# Altium PCB BOARD_4LAYER.PcbDoc (part 21 of 21)
Units mil, origin at the board's own origin, x right, y up, seen from the top; angles counter-clockwise.
Board outline 6692.91 x 10039.37 mil, 4 copper layers (Top Layer, Mid Layer 1, Mid Layer 2, Bottom Layer), stack 66.299 mil thick; 1532 components, 908 nets, 4105 pads, 1286 vias.
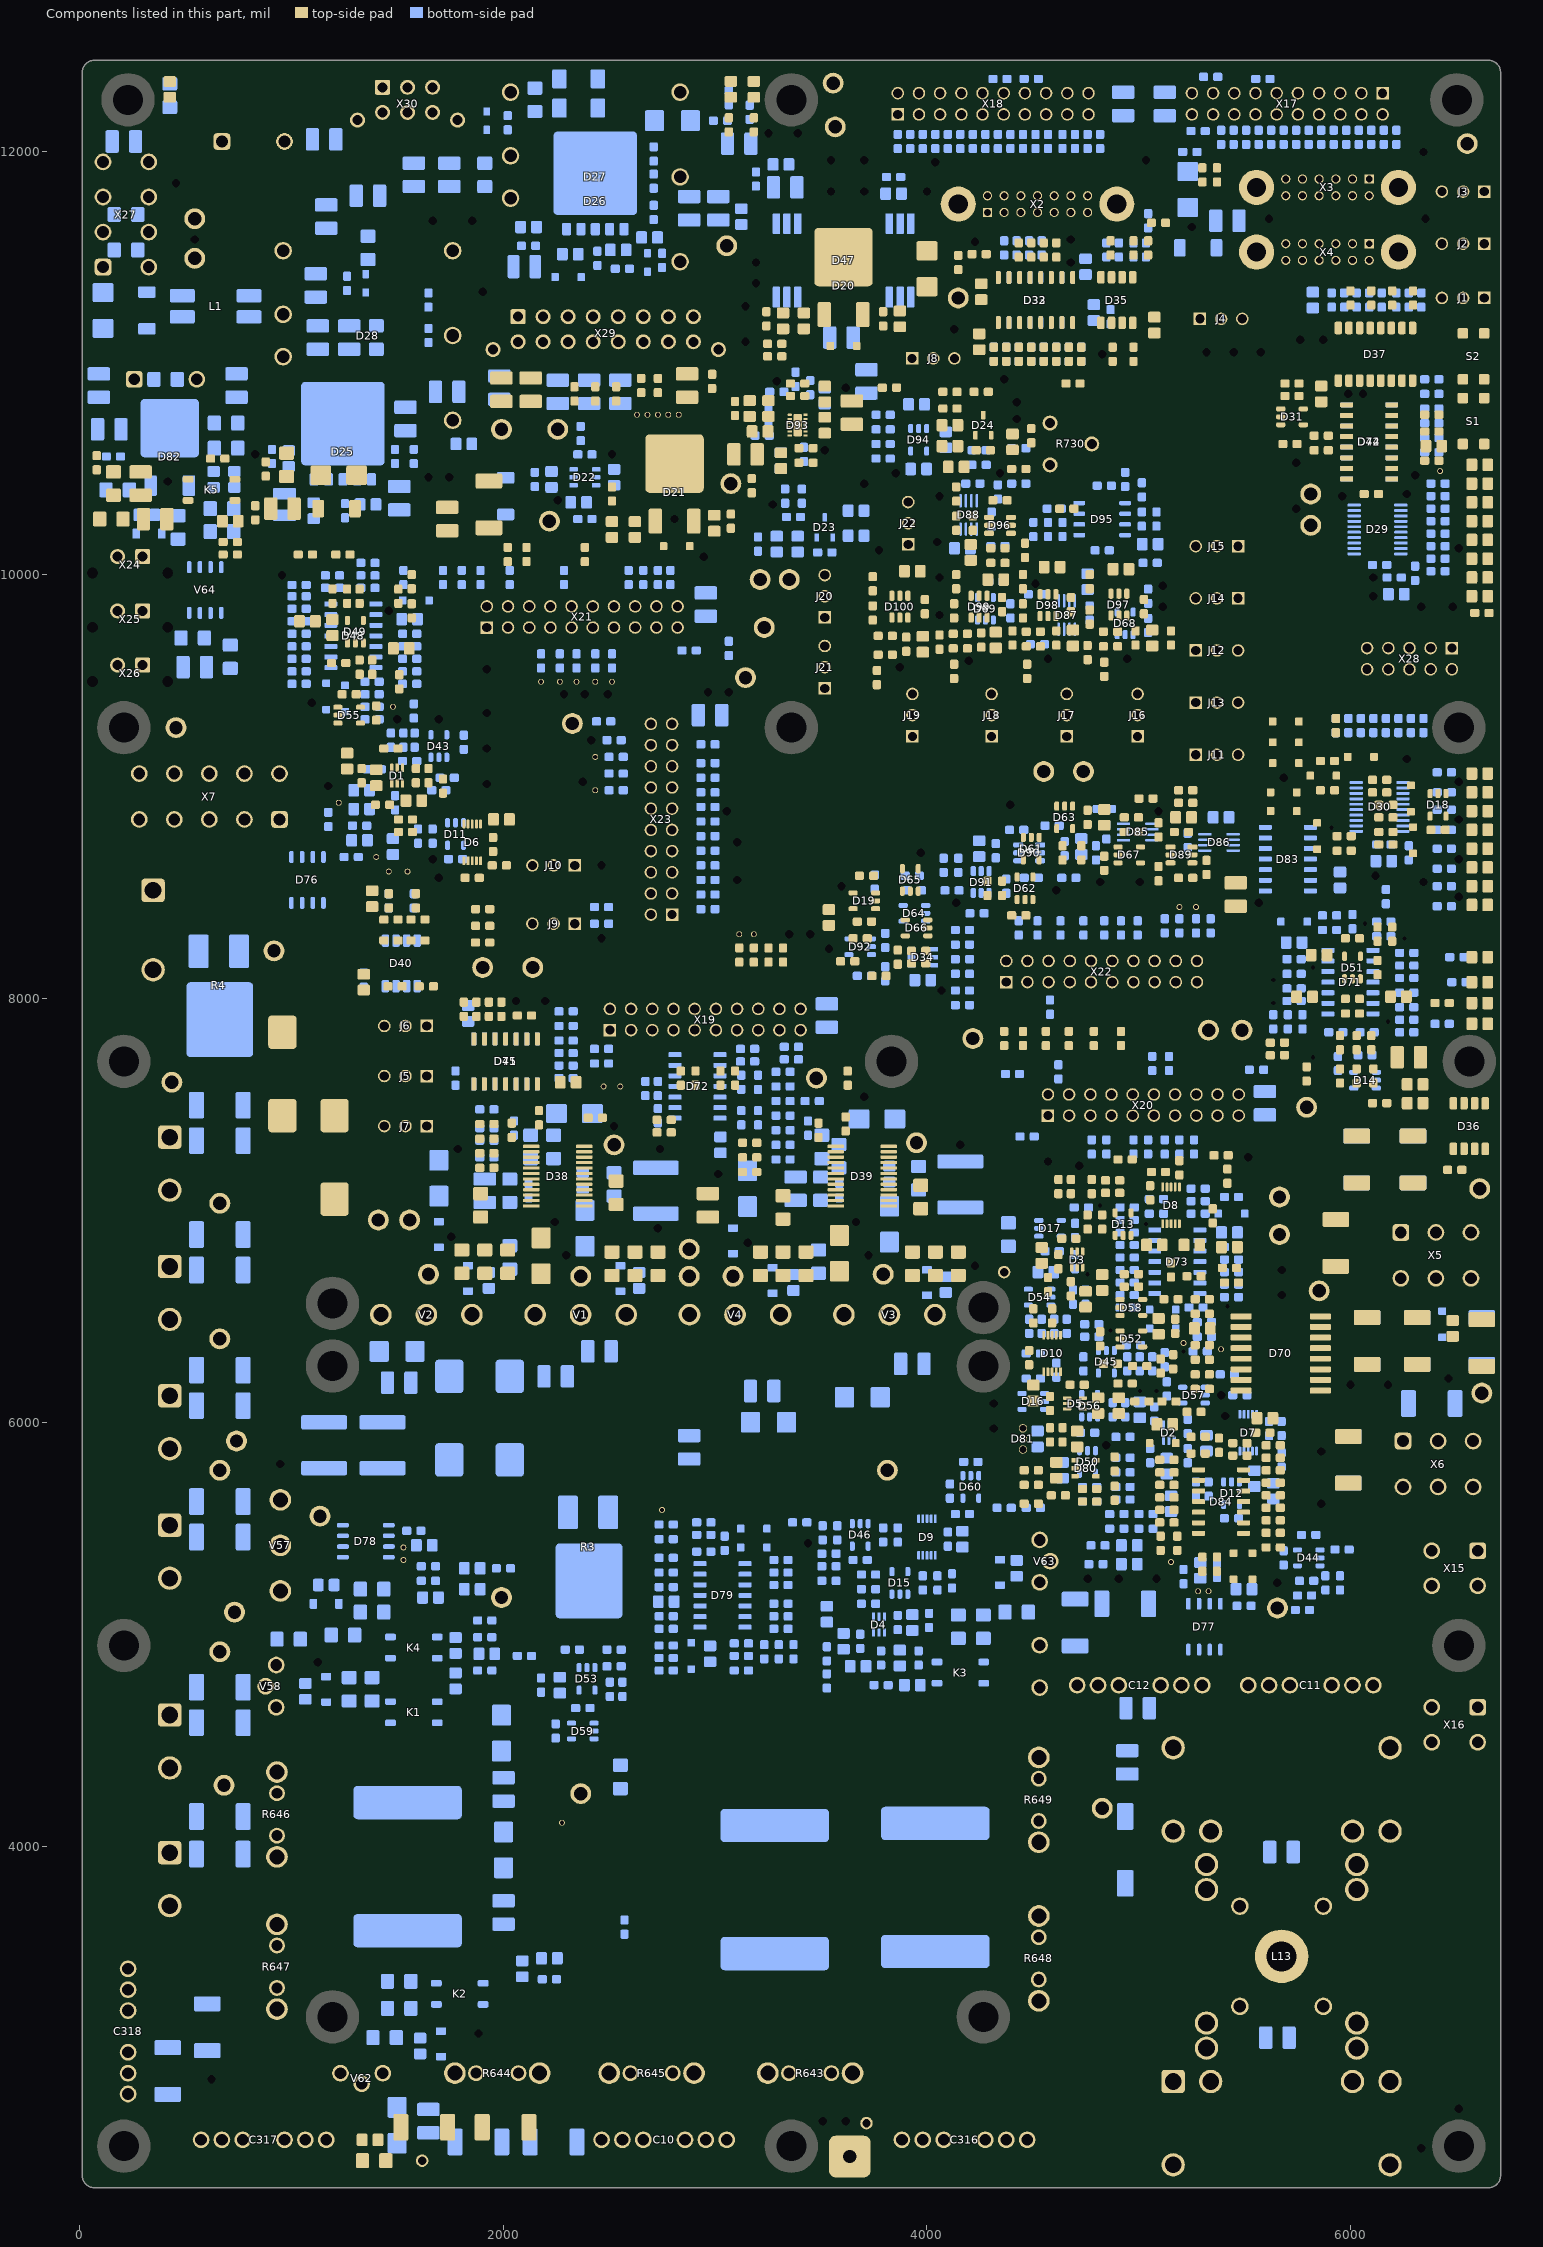
[diagram p23: the components of this part, seen from the top]

## Silkscreen, mask and mechanical layers (free items; w line width, h text height) (continued)
Drill Drawing: (continued)
  text "A" at 3057.09,7362.2 h78.74
  text "E" at 1439.37,7360.24 h78.74
  text "E" at 1539.37,7360.24 h78.74
  text "E" at 1639.37,7360.24 h78.74
  text "T" at 2523.62,7360.24 h78.74
  text "A" at 4230.31,7342.52 h78.74
  text "A" at 5167.32,7338.58 h78.74
  text "A" at 1848.43,7322.83 h78.74
  text "A" at 4316.93,7318.9 h78.74
  text "M" at 427.17,7308.07 h78.74
  text "A" at 2387.8,7295.28 h78.74
  text "A" at 3834.65,7295.28 h78.74
  text "A" at 4576.77,7291.34 h78.74
  text "A" at 3242.13,7283.46 h78.74
  text "A" at 4927.17,7283.46 h78.74
  text "K" at 3950.79,7281.5 h78.74
  text "A" at 2962.6,7279.53 h78.74
  text "A" at 1694.88,7271.65 h78.74
  text "K" at 2523.62,7271.65 h78.74
  text "T" at 4157.48,7271.65 h78.74
  text "A" at 3442.91,7255.91 h78.74
  text "T" at 1785.43,7251.97 h78.74
  text "A" at 2003.94,7251.97 h78.74
  text "T" at 2740.16,7251.97 h78.74
  text "A" at 3084.65,7244.09 h78.74
  text "A" at 3446.85,7216.54 h78.74
  text "A" at 3242.13,7212.6 h78.74
  text "T" at 5515.75,7212.6 h78.74
  text "A" at 2003.94,7208.66 h78.74
  text "T" at 4570.87,7192.91 h78.74
  text "A" at 5084.65,7192.91 h78.74
  text "A" at 4777.56,7181.1 h78.74
  text "A" at 4844.49,7181.1 h78.74
  text "A" at 5230.31,7181.1 h78.74
  text "A" at 3446.85,7177.17 h78.74
  text "T" at 4718.5,7173.23 h78.74
  text "A" at 2003.94,7165.35 h78.74
  text "A" at 5013.78,7145.67 h78.74
  text "T" at 3015.75,7133.86 h78.74
  text "A" at 1120.08,7129.92 h78.74
  text "A" at 1183.07,7129.92 h78.74
  text "A" at 2206.69,7129.92 h78.74
  text "A" at 3643.7,7125.98 h78.74
  text "A" at 4950.79,7110.24 h78.74
  text "A" at 3679.13,7102.36 h78.74
  text "A" at 2230.32,7098.43 h78.74
  text "D" at 690.94,7094.49 h78.74
  text "A" at 1482.28,7094.49 h78.74
  text "A" at 1525.59,7094.49 h78.74
  text "A" at 2966.54,7094.49 h78.74
  text "A" at 5009.84,7090.55 h78.74
  text "A" at 6198.82,7090.55 h78.74
  text "K" at 6608.27,7064.96 h78.74
  text "A" at 5356.3,7062.99 h78.74
  text "M" at 427.17,7058.07 h78.74
  text "A" at 2210.63,7047.24 h78.74
  text "A" at 3643.7,7047.24 h78.74
  text "A" at 4950.79,7043.31 h78.74
  text "A" at 5159.45,7031.5 h78.74
  text "A" at 5001.97,7027.56 h78.74
  text "A" at 6029.53,7027.56 h78.74
  text "K" at 5663.39,7025.59 h78.74
  text "A" at 2210.63,7007.87 h78.74
  text "A" at 3643.7,7007.87 h78.74
  text "K" at 663.39,6996.06 h78.74
  text "R" at 4816.93,6986.22 h78.74
  text "A" at 4383.86,6956.69 h78.74
  text "A" at 4525.59,6948.82 h78.74
  text "A" at 2533.46,6929.13 h78.74
  text "K" at 1411.42,6917.32 h78.74
  text "K" at 1559.06,6917.32 h78.74
  text "T" at 2244.09,6907.48 h78.74
  text "T" at 3665.35,6907.48 h78.74
  text "A" at 3946.85,6905.51 h78.74
  text "A" at 3990.16,6905.51 h78.74
  text "A" at 5277.56,6905.51 h78.74
  text "A" at 5513.78,6901.57 h78.74
  text "A" at 1120.08,6897.64 h78.74
  text "A" at 1183.07,6897.64 h78.74
  text "R" at 5033.46,6897.64 h78.74
  text "A" at 2533.46,6889.76 h78.74
  text "T" at 2730.32,6877.95 h78.74
  text "A" at 1875.98,6862.2 h78.74
  text "A" at 1915.35,6862.2 h78.74
  text "A" at 3297.24,6858.27 h78.74
  text "A" at 3340.55,6858.27 h78.74
  text "A" at 5155.51,6858.27 h78.74
  text "H" at 6236.22,6858.27 h78.74
  text "H" at 6401.57,6858.27 h78.74
  text "H" at 6566.93,6858.27 h78.74
  text "A" at 5336.61,6850.39 h78.74
  text "K" at 5663.39,6848.43 h78.74
  text "T" at 1755.91,6838.58 h78.74
  text "A" at 4584.65,6830.71 h78.74
  text "A" at 4746.06,6814.96 h78.74
  text "T" at 3153.54,6809.06 h78.74
  text "A" at 5159.45,6799.21 h78.74
  text "K" at 2877.95,6779.53 h78.74
  text "A" at 4872.05,6771.65 h78.74
  text "A" at 5588.58,6771.65 h78.74
  text "A" at 5513.78,6759.84 h78.74
  text "T" at 2297.24,6750 h78.74
  text "T" at 3724.41,6750 h78.74
  text "A" at 4777.56,6736.22 h78.74
  text "A" at 4844.49,6736.22 h78.74
  text "A" at 5025.59,6736.22 h78.74
  text "A" at 5360.24,6736.22 h78.74
  text "A" at 1966.54,6720.47 h78.74
  text "A" at 2675.2,6712.6 h78.74
  text "A" at 3375.98,6712.6 h78.74
  text "A" at 4092.52,6712.6 h78.74
  text "A" at 4872.05,6708.66 h78.74
  text "T" at 4226.38,6700.79 h78.74
  text "M" at 427.17,6697.83 h78.74
  text "A" at 5332.68,6696.85 h78.74
  text "T" at 5673.23,6681.1 h78.74
  text "D" at 4364.17,6671.26 h78.74
  text "A" at 5828.74,6669.29 h78.74
  text "K" at 1647.64,6661.42 h78.74
  text "K" at 3793.31,6661.42 h78.74
  text "R" at 4757.87,6661.42 h78.74
  text "A" at 5513.78,6661.42 h78.74
  text "K" at 2366.14,6651.57 h78.74
  text "K" at 2877.95,6651.57 h78.74
  text "K" at 3084.65,6651.57 h78.74
  text "A" at 4722.44,6641.73 h78.74
  text "H" at 6236.22,6641.73 h78.74
  text "H" at 6401.57,6641.73 h78.74
  text "H" at 6566.93,6641.73 h78.74
  text "A" at 5340.55,6625.98 h78.74
  text "A" at 4635.83,6622.05 h78.74
  text "A" at 4521.65,6610.24 h78.74
  text "A" at 5340.55,6586.61 h78.74
  text "A" at 5139.76,6582.68 h78.74
  text "K" at 5850.39,6582.68 h78.74
  text "A" at 5517.72,6578.74 h78.74
  text "T" at 5673.23,6562.99 h78.74
  text "A" at 4627.95,6559.06 h78.74
  text "A" at 1356.3,6555.12 h78.74
  text "A" at 1399.61,6555.12 h78.74
  text "A" at 1454.72,6555.12 h78.74
  text "A" at 1604.33,6555.12 h78.74
  text "A" at 1643.7,6555.12 h78.74
  text "A" at 1683.07,6555.12 h78.74
  text "A" at 2312.99,6555.12 h78.74
  text "A" at 2368.11,6555.12 h78.74
  text "A" at 2419.29,6555.12 h78.74
  text "A" at 2824.8,6555.12 h78.74
  text "A" at 2875.98,6555.12 h78.74
  text "A" at 2923.23,6555.12 h78.74
  text "A" at 3781.5,6555.12 h78.74
  text "A" at 3828.74,6555.12 h78.74
  text "A" at 3049.21,6551.18 h78.74
  text "A" at 3096.46,6551.18 h78.74
  text "A" at 3135.83,6551.18 h78.74
  text "A" at 3549.21,6551.18 h78.74
  text "A" at 3588.58,6551.18 h78.74
  text "A" at 3627.95,6551.18 h78.74
  text "A" at 4828.74,6539.37 h78.74
  text "P" at 1194.88,6523.62 h78.74
  text "A" at 5368.11,6511.81 h78.74
  text "R" at 5417.32,6509.84 h78.74
  text "A" at 4868.11,6507.87 h78.74
  text "A" at 5781.5,6507.87 h78.74
  text "A" at 5820.87,6507.87 h78.74
  text "A" at 5860.24,6507.87 h78.74
  text "A" at 5899.61,6507.87 h78.74
  text "P" at 4265.75,6503.94 h78.74
  text "A" at 4635.83,6492.13 h78.74
  text "A" at 4809.06,6488.19 h78.74
  text "L" at 1422.83,6470.47 h78.74
  text "L" at 1637.8,6470.47 h78.74
  text "L" at 1852.76,6470.47 h78.74
  text "L" at 2151.18,6470.47 h78.74
  text "L" at 2366.14,6470.47 h78.74
  text "L" at 2581.1,6470.47 h78.74
  text "L" at 2879.53,6470.47 h78.74
  text "L" at 3094.49,6470.47 h78.74
  text "L" at 3309.45,6470.47 h78.74
  text "L" at 3607.87,6470.47 h78.74
  text "L" at 3822.83,6470.47 h78.74
  text "L" at 4037.8,6470.47 h78.74
  text "A" at 4840.55,6464.57 h78.74
  text "D" at 683.07,6448.82 h78.74
  text "A" at 5218.5,6448.82 h78.74
  text "M" at 427.17,6447.83 h78.74
  text "A" at 5009.84,6433.07 h78.74
  text "A" at 5214.57,6411.42 h78.74
  text "R" at 4866.14,6395.67 h78.74
  text "A" at 4958.66,6374.02 h78.74
  text "A" at 6391.73,6366.14 h78.74
  text "A" at 4864.17,6358.27 h78.74
  text "K" at 663.39,6356.3 h78.74
  text "A" at 4513.78,6338.58 h78.74
  text "B" at 5210.63,6336.61 h78.74
  text "A" at 4580.71,6334.65 h78.74
  text "A" at 5127.95,6334.65 h78.74
  text "A" at 5064.96,6322.83 h78.74
  text "A" at 4738.19,6314.96 h78.74
  text "B" at 5387.8,6307.09 h78.74
  text "A" at 4057.09,6303.15 h78.74
  text "A" at 4655.51,6299.21 h78.74
  text "R" at 5210.63,6297.24 h78.74
  text "A" at 4608.27,6291.34 h78.74
  text "A" at 4057.09,6255.91 h78.74
  text "A" at 5222.44,6255.91 h78.74
  text "A" at 4777.56,6240.16 h78.74
  text "A" at 6403.54,6240.16 h78.74
  text "P" at 1194.88,6228.35 h78.74
  text "P" at 4265.75,6228.35 h78.74
  text "A" at 4057.09,6200.79 h78.74
  text "T" at 6460.63,6169.29 h78.74
  text "A" at 6076.77,6165.35 h78.74
  text "A" at 5049.21,6161.42 h78.74
  text "A" at 5175.2,6161.42 h78.74
  text "T" at 5998.03,6139.76 h78.74
  text "T" at 6175.2,6139.76 h78.74
  text "A" at 4564.96,6133.86 h78.74
  text "A" at 4612.2,6129.92 h78.74
  text "R" at 5005.91,6110.24 h78.74
  text "R" at 5082.68,6110.24 h78.74
  text "A" at 5171.26,6106.3 h78.74
  text "A" at 5045.28,6102.36 h78.74
  text "K" at 6618.11,6100.39 h78.74
  text "T" at 5387.8,6090.55 h78.74
  text "M" at 427.17,6087.6 h78.74
  text "A" at 5777.56,6059.06 h78.74
  text "A" at 5816.93,6059.06 h78.74
  text "A" at 5856.3,6059.06 h78.74
  text "A" at 5895.67,6059.06 h78.74
  text "A" at 3458.66,6055.12 h78.74
  text "A" at 3509.84,6055.12 h78.74
  text "A" at 4616.14,6055.12 h78.74
  text "A" at 4222.44,6051.18 h78.74
  text "T" at 4314.96,6051.18 h78.74
  text "A" at 5446.85,6047.24 h78.74
  text "A" at 5521.65,6043.31 h78.74
  text "A" at 5352.36,6031.5 h78.74
  text "A" at 2604.33,6027.56 h78.74
  text "A" at 2647.64,6027.56 h78.74
  text "A" at 2690.94,6027.56 h78.74
  text "A" at 2045.28,6019.69 h78.74
  text "A" at 2088.58,6019.69 h78.74
  text "A" at 2131.89,6019.69 h78.74
  text "A" at 3458.66,6015.75 h78.74
  text "A" at 3509.84,6015.75 h78.74
  text "D" at 2183.07,6007.87 h78.74
  text "D" at 2553.15,6007.87 h78.74
  text "A" at 5116.14,6007.87 h78.74
  text "A" at 5171.26,6007.87 h78.74
  text "A" at 3049.21,6003.94 h78.74
  text "A" at 3100.39,6003.94 h78.74
  text "T" at 5407.48,5992.13 h78.74
  text "A" at 2604.33,5988.19 h78.74
  text "A" at 2647.64,5988.19 h78.74
  text "A" at 2690.94,5988.19 h78.74
  text "A" at 4663.39,5984.25 h78.74
  text "A" at 2045.28,5980.31 h78.74
  text "A" at 2088.58,5980.31 h78.74
  text "A" at 2131.89,5980.31 h78.74
  text "A" at 4698.82,5968.5 h78.74
  text "A" at 3049.21,5960.63 h78.74
  text "A" at 3100.39,5960.63 h78.74
  text "A" at 5293.31,5960.63 h78.74
  text "A" at 2604.33,5948.82 h78.74
  text "A" at 2647.64,5948.82 h78.74
  text "A" at 2690.94,5948.82 h78.74
  text "A" at 4860.24,5944.88 h78.74
  text "A" at 5722.44,5944.88 h78.74
  text "A" at 2045.28,5940.94 h78.74
  text "A" at 2088.58,5940.94 h78.74
  text "A" at 2131.89,5940.94 h78.74
  text "A" at 4958.66,5935.04 h78.74
  text "C" at 4452.76,5933.86 h78.74
  text "T" at 4314.96,5933.07 h78.74
  text "A" at 5372.05,5929.13 h78.74
  text "A" at 5490.16,5917.32 h78.74
  text "A" at 5037.4,5913.39 h78.74
  text "D" at 2183.07,5909.45 h78.74
  text "D" at 2553.15,5909.45 h78.74
  text "A" at 2604.33,5909.45 h78.74
  text "A" at 2647.64,5909.45 h78.74
  text "A" at 2690.94,5909.45 h78.74
  text "C" at 4452.76,5883.86 h78.74
  text "A" at 4757.87,5875.98 h78.74
  text "K" at 742.13,5874.02 h78.74
  text "H" at 6246.06,5874.02 h78.74
  text "H" at 6411.42,5874.02 h78.74
  text "H" at 6576.77,5874.02 h78.74
  text "A" at 4994.09,5858.27 h78.74
  text "T" at 4846.46,5854.33 h78.74
  text "M" at 427.17,5837.6 h78.74
  text "C" at 4452.76,5833.86 h78.74
  text "A" at 4222.44,5830.71 h78.74
  text "T" at 5860.24,5824.8 h78.74
  text "A" at 4635.83,5822.83 h78.74
  text "A" at 4844.49,5805.12 h78.74
  text "A" at 5801.18,5803.15 h78.74
  text "A" at 4557.09,5795.28 h78.74
  text "A" at 1576.77,5787.4 h78.74
  text "A" at 1627.95,5787.4 h78.74
  text "A" at 5013.78,5787.4 h78.74
  text "A" at 5553.15,5783.46 h78.74
  text "A" at 3718.5,5779.53 h78.74
  text "A" at 5403.54,5779.53 h78.74
  text "A" at 3029.53,5775.59 h78.74
  text "A" at 4521.65,5775.59 h78.74
  text "A" at 5316.93,5775.59 h78.74
  text "T" at 948.82,5765.75 h78.74
  text "A" at 1576.77,5748.03 h78.74
  text "A" at 1627.95,5748.03 h78.74
  text "A" at 4309.06,5748.03 h78.74
  text "A" at 3718.5,5740.16 h78.74
  text "A" at 4005.91,5740.16 h78.74
  text "A" at 4348.43,5740.16 h78.74
  text "A" at 5442.91,5740.16 h78.74
  text "K" at 663.39,5736.22 h78.74
  text "K" at 3812.99,5736.22 h78.74
  text "A" at 3029.53,5732.28 h78.74
  text "D" at 3080.71,5732.28 h78.74
  text "D" at 3667.32,5732.28 h78.74
  text "A" at 5222.44,5728.35 h78.74
  text "A" at 4108.27,5716.54 h78.74
  text "A" at 5801.18,5716.54 h78.74
  text "A" at 5013.78,5712.6 h78.74
  text "A" at 4320.87,5708.66 h78.74
  text "A" at 1576.77,5704.72 h78.74
  text "A" at 1627.95,5704.72 h78.74
  text "A" at 5057.09,5700.79 h78.74
  text "A" at 3718.5,5692.91 h78.74
  text "A" at 3029.53,5688.98 h78.74
  text "A" at 4848.43,5687.01 h78.74
  text "A" at 5368.11,5681.1 h78.74
  text "A" at 4005.91,5661.42 h78.74
  text "H" at 6246.06,5657.48 h78.74
  text "H" at 6411.42,5657.48 h78.74
  text "H" at 6576.77,5657.48 h78.74
  text "A" at 4269.69,5653.54 h78.74
  text "A" at 5706.69,5649.61 h78.74
  text "A" at 5801.18,5633.86 h78.74
  text "A" at 5005.91,5625.98 h78.74
  text "A" at 5049.21,5625.98 h78.74
  text "A" at 4694.88,5622.05 h78.74
  text "A" at 2214.57,5618.11 h78.74
  text "A" at 5222.44,5618.11 h78.74
  text "A" at 5442.91,5614.17 h78.74
  text "A" at 5994.09,5614.17 h78.74
  text "A" at 5553.15,5606.3 h78.74
  text "L" at 948.82,5596.85 h78.74
  text "A" at 5706.69,5590.55 h78.74
  text "A" at 5053.15,5578.74 h78.74
  text "T" at 5860.24,5578.74 h78.74
  text "A" at 5360.24,5574.8 h78.74
  text "A" at 2214.57,5570.87 h78.74
  text "A" at 4194.88,5570.87 h78.74
  text "A" at 1222.44,5566.93 h78.74
  text "A" at 1261.81,5566.93 h78.74
  text "A" at 2706.69,5562.99 h78.74
  text "A" at 2809.06,5562.99 h78.74
  text "A" at 2923.23,5562.99 h78.74
  text "A" at 3155.51,5562.99 h78.74
  text "A" at 3277.56,5562.99 h78.74
  text "A" at 3379.92,5562.99 h78.74
  text "A" at 3470.47,5562.99 h78.74
  text "A" at 3561.02,5562.99 h78.74
  text "A" at 3679.13,5562.99 h78.74
  text "A" at 3777.56,5562.99 h78.74
  text "A" at 3895.67,5562.99 h78.74
  text "A" at 4580.71,5559.06 h78.74
  text "B" at 2750,5549.21 h78.74
  text "A" at 2214.57,5527.56 h78.74
  text "A" at 1222.44,5523.62 h78.74
  text "A" at 1261.81,5523.62 h78.74
  text "K" at 1135.83,5519.69 h78.74
  text "A" at 3903.54,5507.87 h78.74
  text "A" at 4820.87,5507.87 h78.74
  text "A" at 5710.63,5500 h78.74
  text "A" at 4116.14,5488.19 h78.74
  text "A" at 2214.57,5480.31 h78.74
  text "M" at 427.17,5477.36 h78.74
  text "A" at 5801.18,5472.44 h78.74
  text "A" at 5954.72,5472.44 h78.74
  text "A" at 6053.15,5472.44 h78.74
  text "A" at 4009.84,5468.5 h78.74
  text "A" at 3068.9,5464.57 h78.74
  text "A" at 5442.91,5464.57 h78.74
  text "A" at 4702.76,5460.63 h78.74
  text "A" at 4765.75,5460.63 h78.74
  text "A" at 4816.93,5460.63 h78.74
  text "A" at 3427.17,5448.82 h78.74
  text "A" at 5710.63,5444.88 h78.74
  text "A" at 1663.39,5433.07 h78.74
  text "A" at 4462.6,5433.07 h78.74
  text "A" at 2870.08,5425.2 h78.74
  text "A" at 4872.05,5421.26 h78.74
  text "A" at 1021.65,5413.39 h78.74
  text "H" at 4531.5,5407.48 h78.74
  text "A" at 5883.86,5405.51 h78.74
  text "A" at 5281.5,5401.57 h78.74
  text "T" at 3438.98,5391.73 h78.74
  text "A" at 4462.6,5389.76 h78.74
  text "A" at 1143.7,5385.83 h78.74
  text "A" at 1183.07,5385.83 h78.74
  text "L" at 948.82,5381.89 h78.74
  text "A" at 1718.5,5381.89 h78.74
  text "A" at 6053.15,5381.89 h78.74
  text "B" at 1529.53,5372.05 h78.74
  text "A" at 2269.68,5370.08 h78.74
  text "A" at 2328.74,5370.08 h78.74
  text "A" at 2387.8,5370.08 h78.74
  text "A" at 2450.79,5370.08 h78.74
  text "A" at 2521.65,5370.08 h78.74
  text "A" at 3320.87,5368.11 h78.74
  text "A" at 2828.74,5366.14 h78.74
  text "A" at 2706.69,5362.2 h78.74
  text "A" at 2659.45,5358.27 h78.74
  text "H" at 6381.89,5356.3 h78.74
  text "H" at 6598.43,5356.3 h78.74
  text "A" at 3828.74,5354.33 h78.74
  text "A" at 1143.7,5346.46 h78.74
  text "A" at 1183.07,5346.46 h78.74
  text "A" at 1021.65,5342.52 h78.74
  text "A" at 5631.89,5322.83 h78.74
  text "A" at 2269.68,5318.9 h78.74
  text "A" at 2328.74,5318.9 h78.74
  text "A" at 2387.8,5318.9 h78.74
  text "A" at 2450.79,5318.9 h78.74
  text "A" at 2521.65,5318.9 h78.74
  text "A" at 5218.5,5318.9 h78.74
  text "A" at 3761.81,5314.96 h78.74
  text "B" at 1529.53,5312.99 h78.74
  text "A" at 2978.35,5311.02 h78.74
  text "A" at 3462.6,5311.02 h78.74
  text "A" at 1143.7,5307.09 h78.74
  text "A" at 1183.07,5307.09 h78.74
  text "H" at 4581.5,5307.48 h78.74
  text "A" at 5915.35,5307.09 h78.74
  text "B" at 5151.57,5303.15 h78.74
  text "A" at 2127.95,5291.34 h78.74
  text "A" at 3978.35,5291.34 h78.74
  text "A" at 2080.71,5275.59 h78.74
  text "A" at 2269.68,5267.72 h78.74
  text "A" at 2328.74,5267.72 h78.74
  text "A" at 2387.8,5267.72 h78.74
  text "A" at 2450.79,5267.72 h78.74
  text "A" at 2521.65,5267.72 h78.74
  text "A" at 6053.15,5267.72 h78.74
  text "A" at 2659.45,5255.91 h78.74
  text "A" at 3458.66,5248.03 h78.74
  text "M" at 427.17,5227.36 h78.74
  text "T" at 4757.87,5224.41 h78.74
  text "T" at 4905.51,5224.41 h78.74
  text "T" at 5082.68,5224.41 h78.74
  text "A" at 2269.68,5216.54 h78.74
  text "A" at 2328.74,5216.54 h78.74
  text "A" at 2387.8,5216.54 h78.74
  text "A" at 2450.79,5216.54 h78.74
  text "A" at 2521.65,5216.54 h78.74
  text "A" at 3797.24,5208.66 h78.74
  text "H" at 4531.5,5207.48 h78.74
  text "T" at 5653.54,5204.72 h78.74
  text "A" at 3931.1,5196.85 h78.74
  text "H" at 6381.89,5190.94 h78.74
  text "H" at 6598.43,5190.94 h78.74
  text "A" at 1734.25,5181.1 h78.74
  text "A" at 4163.39,5181.1 h78.74
  text "A" at 6053.15,5181.1 h78.74
  text "L" at 948.82,5166.93 h78.74
  text "A" at 2269.68,5165.35 h78.74
  text "A" at 2328.74,5165.35 h78.74
  text "A" at 2387.8,5165.35 h78.74
  text "A" at 2450.79,5165.35 h78.74
  text "A" at 2521.65,5165.35 h78.74
  text "B" at 5279.53,5165.35 h78.74
  text "B" at 5328.74,5165.35 h78.74
  text "A" at 3423.23,5161.42 h78.74
  text "A" at 2864.17,5153.54 h78.74
  text "A" at 3309.06,5149.61 h78.74
  text "A" at 3525.59,5143.7 h78.74
  text "K" at 1992.13,5135.83 h78.74
  text "A" at 3202.76,5135.83 h78.74
  text "A" at 5576.77,5129.92 h78.74
  text "A" at 5915.35,5114.17 h78.74
  text "A" at 5100.39,5110.24 h78.74
  text "A" at 2127.95,5106.3 h78.74
  text "A" at 2269.68,5106.3 h78.74
  text "A" at 2328.74,5106.3 h78.74
  text "A" at 2387.8,5106.3 h78.74
  text "A" at 2450.79,5106.3 h78.74
  text "A" at 2521.65,5106.3 h78.74
  text "A" at 2659.45,5102.36 h78.74
  text "A" at 3387.8,5100.39 h78.74
  text "A" at 3828.74,5098.43 h78.74
  text "A" at 6053.15,5094.49 h78.74
  text "K" at 5653.54,5086.61 h78.74
  text "K" at 732.28,5066.93 h78.74
  text "A" at 2269.68,5055.12 h78.74
  text "A" at 2328.74,5055.12 h78.74
  text "A" at 2387.8,5055.12 h78.74
  text "A" at 2450.79,5055.12 h78.74
  text "A" at 2521.65,5055.12 h78.74
  text "A" at 3718.5,5043.31 h78.74
  text "A" at 2690.94,5023.62 h78.74
  text "A" at 3655.51,5019.69 h78.74
  text "A" at 3379.92,5017.72 h78.74
  text "A" at 1368.11,4996.06 h78.74
  text "A" at 1133.86,4964.57 h78.74
  text "A" at 3525.59,4962.6 h78.74
  text "A" at 4009.84,4948.82 h78.74
  text "A" at 2127.95,4940.94 h78.74
  text "A" at 2328.74,4940.94 h78.74
  text "A" at 2557.09,4940.94 h78.74
  text "A" at 2659.45,4940.94 h78.74
  text "A" at 3970.47,4937.01 h78.74
  text "A" at 3765.75,4929.13 h78.74
  text "A" at 3923.23,4925.2 h78.74
  text "A" at 1998.03,4921.26 h78.74
  text "H" at 4531.5,4911.02 h78.74
  text "P" at 210.63,4909.45 h78.74
  text "P" at 6509.84,4909.45 h78.74
  text "K" at 663.39,4879.92 h78.74
  text "A" at 2608.27,4866.14 h78.74
  text "A" at 1419.29,4850.39 h78.74
  text "A" at 2403.54,4850.39 h78.74
  text "T" at 1125.98,4830.71 h78.74
  text "H" at 929.13,4817.32 h78.74
  text "A" at 2265.75,4811.02 h78.74
  text "A" at 1687.01,4807.09 h78.74
  text "A" at 3588.58,4807.09 h78.74
  text "A" at 1990.16,4801.18 h78.74
  text "A" at 2935.04,4779.53 h78.74
  text "A" at 2600.39,4771.65 h78.74
  text "A" at 3820.87,4771.65 h78.74
  text "A" at 3466.54,4767.72 h78.74
  text "H" at 4708.66,4722.44 h78.74
  text "H" at 4807.09,4722.44 h78.74
  text "H" at 4905.51,4722.44 h78.74
  text "H" at 5102.36,4722.44 h78.74
  text "H" at 5200.79,4722.44 h78.74
  text "H" at 5299.21,4722.44 h78.74
  text "H" at 5515.75,4722.44 h78.74
  text "H" at 5614.17,4722.44 h78.74
  text "H" at 5712.6,4722.44 h78.74
  text "H" at 5909.45,4722.44 h78.74
  text "H" at 6007.87,4722.44 h78.74
  text "H" at 6106.3,4722.44 h78.74
  text "A" at 3206.69,4720.47 h78.74
  text "A" at 3250,4720.47 h78.74
  text "A" at 3702.76,4720.47 h78.74
  text "H" at 879.13,4717.32 h78.74
  text "H" at 4531.5,4711.02 h78.74
  text "A" at 3596.46,4681.1 h78.74
  text "A" at 3368.11,4677.17 h78.74
  text "A" at 2931.1,4665.35 h78.74
  text "A" at 1005.91,4645.67 h78.74
  text "H" at 6381.89,4618.11 h78.74
  text "H" at 6598.43,4618.11 h78.74
  text "H" at 929.13,4617.32 h78.74
  text "A" at 1005.91,4606.3 h78.74
  text "A" at 1919.29,4582.68 h78.74
  text "M" at 427.17,4581.69 h78.74
  text "A" at 1529.53,4543.31 h78.74
  text "A" at 2789.37,4531.5 h78.74
  text "D" at 3005.91,4519.69 h78.74
  text "A" at 2927.17,4484.25 h78.74
  text "A" at 2474.41,4468.5 h78.74
  text "A" at 1269.68,4464.57 h78.74
  text "A" at 1324.8,4464.57 h78.74
  text "H" at 6381.89,4452.76 h78.74
  text "H" at 6598.43,4452.76 h78.74
  text "A" at 2883.86,4440.94 h78.74
  text "M" at 5161.42,4427.17 h78.74
  text "M" at 6185.04,4427.17 h78.74
  text "A" at 1269.68,4425.2 h78.74
  text "A" at 1324.8,4425.2 h78.74
  text "A" at 2250,4425.2 h78.74
  text "A" at 2667.32,4401.57 h78.74
  text "A" at 2844.49,4401.57 h78.74
  text "A" at 2557.09,4397.64 h78.74
  text "L" at 4527.56,4381.1 h78.74
  text "A" at 2809.06,4366.14 h78.74
  text "M" at 427.17,4331.69 h78.74
  text "A" at 2769.68,4330.71 h78.74
  text "L" at 933.07,4312.2 h78.74
  text "G" at 4527.56,4281.1 h78.74
  text "K" at 683.07,4250 h78.74
  text "G" at 933.07,4212.2 h78.74
  text "K" at 2366.14,4210.63 h78.74
  text "A" at 3801.18,4196.85 h78.74
  text "A" at 3879.92,4196.85 h78.74
  text "A" at 3970.47,4196.85 h78.74
  text "A" at 4053.15,4196.85 h78.74
  text "A" at 4139.76,4196.85 h78.74
  text "A" at 4238.19,4196.85 h78.74
  text "A" at 3068.9,4177.17 h78.74
  text "A" at 3124.02,4177.17 h78.74
  text "A" at 3183.07,4177.17 h78.74
  text "A" at 3246.06,4177.17 h78.74
  text "A" at 3309.06,4177.17 h78.74
  text "A" at 3368.11,4177.17 h78.74
  text "A" at 3438.98,4177.17 h78.74
  text "A" at 3509.84,4177.17 h78.74
  text "A" at 3584.65,4177.17 h78.74
  text "A" at 2277.56,4157.48 h78.74
  text "K" at 4826.77,4141.73 h78.74
  text "A" at 2277.56,4118.11 h78.74
  text "A" at 2057.09,4106.3 h78.74
  text "G" at 4527.56,4081.1 h78.74
  text "B" at 2277.56,4072.83 h78.74
  text "A" at 1301.18,4047.24 h78.74
  text "A" at 1368.11,4047.24 h78.74
  text "A" at 1446.85,4047.24 h78.74
  text "A" at 1521.65,4047.24 h78.74
  text "A" at 1600.39,4047.24 h78.74
  text "A" at 1690.94,4047.24 h78.74
  text "A" at 1789.37,4047.24 h78.74
  text "M" at 5161.42,4033.46 h78.74
  text "M" at 5338.58,4033.46 h78.74
  text "M" at 6007.87,4033.46 h78.74
  text "M" at 6185.04,4033.46 h78.74
  text "G" at 933.07,4012.2 h78.74
  text "L" at 4527.56,3981.1 h78.74
  text "A" at 3068.9,3940.94 h78.74
  text "A" at 3124.02,3940.94 h78.74
  text "A" at 3183.07,3940.94 h78.74
  text "A" at 3246.06,3940.94 h78.74
  text "A" at 3309.06,3940.94 h78.74
  text "A" at 3368.11,3940.94 h78.74
  text "A" at 3438.98,3940.94 h78.74
  text "A" at 3509.84,3940.94 h78.74
  text "A" at 3584.65,3940.94 h78.74
  text "M" at 427.17,3932.09 h78.74
  text "A" at 3801.18,3913.39 h78.74
  text "A" at 3879.92,3913.39 h78.74
  text "A" at 3970.47,3913.39 h78.74
  text "A" at 4053.15,3913.39 h78.74
  text "A" at 4139.76,3913.39 h78.74
  text "A" at 4238.19,3913.39 h78.74
  text "L" at 933.07,3912.2 h78.74
  text "M" at 5318.9,3875.98 h78.74
  text "M" at 6027.56,3875.98 h78.74
  text "D" at 2379.92,3866.14 h78.74
  text "A" at 2352.36,3814.96 h78.74
  text "A" at 2411.42,3814.96 h78.74
  text "A" at 2379.92,3787.4 h78.74
  text "M" at 5318.9,3757.87 h78.74
  text "M" at 6027.56,3757.87 h78.74
  text "A" at 2352.36,3755.91 h78.74
  text "A" at 2407.48,3755.91 h78.74
  text "D" at 2383.86,3708.66 h78.74
  text "A" at 1301.18,3700.79 h78.74
  text "A" at 1368.11,3700.79 h78.74
  text "A" at 1446.85,3700.79 h78.74
  text "A" at 1521.65,3700.79 h78.74
  text "A" at 1600.39,3700.79 h78.74
  text "A" at 1690.94,3700.79 h78.74
  text "A" at 1789.37,3700.79 h78.74
  text "M" at 427.17,3682.09 h78.74
  text "J" at 5476.38,3679.13 h78.74
  text "J" at 5870.08,3679.13 h78.74
  text "A" at 2572.83,3657.48 h78.74
  text "L" at 4527.56,3633.07 h78.74
  text "L" at 933.07,3593.7 h78.74
  text "A" at 3068.9,3594.49 h78.74
  text "A" at 3124.02,3594.49 h78.74
  text "A" at 3183.07,3594.49 h78.74
  text "A" at 3246.06,3594.49 h78.74
  text "A" at 3309.06,3594.49 h78.74
  text "A" at 3368.11,3594.49 h78.74
  text "A" at 3438.98,3594.49 h78.74
  text "A" at 3509.84,3594.49 h78.74
  text "A" at 3584.65,3594.49 h78.74
  text "A" at 3789.37,3574.8 h78.74
  text "A" at 3844.49,3574.8 h78.74
  text "A" at 3903.54,3574.8 h78.74
  text "A" at 3970.47,3574.8 h78.74
  text "A" at 4041.34,3574.8 h78.74
  text "A" at 4104.33,3574.8 h78.74
  text "A" at 4175.2,3574.8 h78.74
  text "A" at 4238.19,3574.8 h78.74
  text "A" at 4301.18,3574.8 h78.74
  text "A" at 2064.96,3547.24 h78.74
  text "G" at 4527.56,3533.07 h78.74
  text "G" at 933.07,3493.7 h78.74
  text "P" at 5673.23,3442.91 h78.74
  text "H" at 230.31,3383.86 h78.74
  text "A" at 2299.21,3372.05 h78.74
  text "A" at 3789.37,3362.2 h78.74
  text "A" at 3844.49,3362.2 h78.74
  text "A" at 3903.54,3362.2 h78.74
  text "A" at 3970.47,3362.2 h78.74
  text "A" at 4041.34,3362.2 h78.74
  text "A" at 4104.33,3362.2 h78.74
  text "A" at 4175.2,3362.2 h78.74
  text "A" at 4238.19,3362.2 h78.74
  text "A" at 4301.18,3362.2 h78.74
  text "A" at 3068.9,3346.46 h78.74
  text "A" at 3124.02,3346.46 h78.74
  text "A" at 3183.07,3346.46 h78.74
  text "A" at 3246.06,3346.46 h78.74
  text "A" at 3309.06,3346.46 h78.74
  text "A" at 3368.11,3346.46 h78.74
  text "A" at 3438.98,3346.46 h78.74
  text "A" at 3509.84,3346.46 h78.74
  text "A" at 3584.65,3346.46 h78.74
  text "G" at 4527.56,3333.07 h78.74
  text "G" at 933.07,3293.7 h78.74
  text "H" at 230.31,3285.43 h78.74
  text "L" at 4527.56,3233.07 h78.74
  text "J" at 5476.38,3206.69 h78.74
  text "J" at 5870.08,3206.69 h78.74
  text "L" at 933.07,3193.7 h78.74
  text "H" at 230.31,3187.01 h78.74
  text "A" at 1687.01,3169.29 h78.74
  text "P" at 1194.88,3157.48 h78.74
  text "P" at 4265.75,3157.48 h78.74
  text "M" at 5318.9,3127.95 h78.74
  text "M" at 6027.56,3127.95 h78.74
  text "T" at 1883.86,3078.74 h78.74
  text "M" at 5318.9,3009.84 h78.74
  text "M" at 6027.56,3009.84 h78.74
  text "H" at 230.31,2990.16 h78.74
  text "H" at 230.31,2891.73 h78.74
  text "H" at 1232.68,2891.73 h78.74
  text "H" at 1432.68,2891.73 h78.74
  text "L" at 1772.44,2891.73 h78.74
  text "G" at 1872.44,2891.73 h78.74
  text "G" at 2072.44,2891.73 h78.74
  text "L" at 2172.44,2891.73 h78.74
  text "L" at 2500.79,2891.73 h78.74
  text "G" at 2600.79,2891.73 h78.74
  text "G" at 2800.79,2891.73 h78.74
  text "L" at 2900.79,2891.73 h78.74
  text "L" at 3248.82,2891.73 h78.74
  text "G" at 3348.82,2891.73 h78.74
  text "G" at 3548.82,2891.73 h78.74
  text "L" at 3648.82,2891.73 h78.74
  text "T" at 624.02,2862.2 h78.74
  text "M" at 5161.42,2852.36 h78.74
  text "M" at 5338.58,2852.36 h78.74
  text "M" at 6007.87,2852.36 h78.74
  text "M" at 6185.04,2852.36 h78.74
  text "H" at 1332.68,2841.73 h78.74
  text "H" at 230.31,2793.31 h78.74
  text "T" at 6509.84,2724.41 h78.74
  text "T" at 3507.87,2665.35 h78.74
  text "T" at 3616.14,2665.35 h78.74
  text "D" at 3714.57,2655.51 h78.74
  text "H" at 574.8,2576.77 h78.74
  text "H" at 673.23,2576.77 h78.74
  text "H" at 771.65,2576.77 h78.74
  text "H" at 968.5,2576.77 h78.74
  text "H" at 1066.93,2576.77 h78.74
  text "H" at 1165.35,2576.77 h78.74
  text "H" at 2464.57,2576.77 h78.74
  text "H" at 2562.99,2576.77 h78.74
  text "H" at 2661.42,2576.77 h78.74
  text "H" at 2858.27,2576.77 h78.74
  text "H" at 2956.69,2576.77 h78.74
  text "H" at 3055.12,2576.77 h78.74
  text "H" at 3881.89,2576.77 h78.74
  text "H" at 3980.32,2576.77 h78.74
  text "H" at 4078.74,2576.77 h78.74
  text "H" at 4275.59,2576.77 h78.74
  text "H" at 4374.02,2576.77 h78.74
  text "H" at 4472.44,2576.77 h78.74
  text "P" at 210.63,2547.24 h78.74
  text "P" at 3360.24,2547.24 h78.74
  text "P" at 6509.84,2547.24 h78.74
  text "T" at 6332.68,2537.4 h78.74
  text "K" at 3635.83,2498.03 h78.74
  text "D" at 1618.11,2478.35 h78.74
  text "M" at 5161.42,2458.66 h78.74
  text "M" at 6185.04,2458.66 h78.74
  text "Through Holes" at 2183.46,1917.32 h47.24
  text "Symbol" at 121.78,1728.35 h47.24
  text "Diameter" at 784.53,1728.35 h47.24
  text "Tolerance" at 1657.82,1728.35 h47.24
  text "Plated" at 2389.69,1728.35 h47.24
  text "Punched" at 2885.01,1728.35 h47.24
  text "HoleName" at 3618.26,1728.35 h47.24
  text "Quantity" at 4422.41,1728.35 h47.24
  text "A" at 240.16,1586.61 h47.24
  text "0.3500" at 833.19,1586.61 h47.24
  text "Yes" at 2459.38,1586.61 h47.24
  text "No" at 3002.9,1586.61 h47.24
  text "Rnd 0,35" at 3626.05,1586.61 h47.24
  text "1270" at 4515.09,1586.61 h47.24
  text "B" at 240.16,1492.13 h47.24
  text "0.5000" at 833.19,1492.13 h47.24
  text "Yes" at 2459.38,1492.13 h47.24
  text "No" at 3002.9,1492.13 h47.24
  text "Rnd 0,5" at 3649.36,1492.13 h47.24
  text "33" at 4561.94,1492.13 h47.24
  text "C" at 240.16,1397.64 h47.24
  text "0.8000" at 833.38,1397.64 h47.24
  text "Yes" at 2459.38,1397.64 h47.24
  text "No" at 3002.9,1397.64 h47.24
  text "Rnd 0,8" at 3649.55,1397.64 h47.24
  text "41" at 4562.37,1397.64 h47.24
  text "D" at 240.16,1303.15 h47.24
  text "1.0000" at 833.92,1303.15 h47.24
  text "Yes" at 2459.38,1303.15 h47.24
  text "No" at 3002.9,1303.15 h47.24
  text "Rnd 1" at 3693.06,1303.15 h47.24
  text "19" at 4562.37,1303.15 h47.24
  text "E" at 240.16,1208.66 h47.24
  text "1.1000" at 834.64,1208.66 h47.24
  text "Yes" at 2459.38,1208.66 h47.24
  text "No" at 3002.9,1208.66 h47.24
  text "Rnd 1,1" at 3650.85,1208.66 h47.24
  text "216" at 4538.66,1208.66 h47.24
  text "F" at 240.16,1114.17 h47.24
  text "1.2000" at 833.92,1114.17 h47.24
  text "Yes" at 2459.38,1114.17 h47.24
  text "No" at 3002.9,1114.17 h47.24
  text "Rnd 1,2" at 3650.1,1114.17 h47.24
  text "35" at 4561.94,1114.17 h47.24
  text "G" at 240.16,1019.68 h47.24
  text "1.3000" at 833.92,1019.68 h47.24
  text "Yes" at 2459.38,1019.68 h47.24
  text "No" at 3002.9,1019.68 h47.24
  text "Rnd 1,3" at 3650.1,1019.68 h47.24
  text "14" at 4562.37,1019.68 h47.24
  text "H" at 240.16,925.2 h47.24
  text "1.4000" at 833.92,925.2 h47.24
  text "Yes" at 2459.38,925.2 h47.24
  text "No" at 3002.9,925.2 h47.24
  text "Rnd 1.4" at 3650.17,925.2 h47.24
  text "89" at 4562.05,925.2 h47.24
  text "J" at 240.16,830.71 h47.24
  text "1.5000" at 833.92,830.71 h47.24
  text "Yes" at 2459.38,830.71 h47.24
  text "No" at 3002.9,830.71 h47.24
  text "Rnd 1,5" at 3650.1,830.71 h47.24
  text "16" at 4562.37,830.71 h47.24
  text "K" at 240.16,736.22 h47.24
  text "1.6000" at 833.92,736.22 h47.24
  text "Yes" at 2459.38,736.22 h47.24
  text "No" at 3002.9,736.22 h47.24
  text "Rnd 1,6" at 3650.1,736.22 h47.24
  text "59" at 4561.94,736.22 h47.24
  text "L" at 240.16,641.73 h47.24
  text "1.8000" at 834.1,641.73 h47.24
  text "Yes" at 2459.38,641.73 h47.24
  text "No" at 3002.9,641.73 h47.24
  text "Rnd 1,8" at 3650.29,641.73 h47.24
  text "29" at 4561.94,641.73 h47.24
  text "M" at 240.16,547.24 h47.24
  text "2.0000" at 833.19,547.24 h47.24
  text "Yes" at 2459.38,547.24 h47.24
  text "No" at 3002.9,547.24 h47.24
  text "Rnd 2" at 3692.37,547.24 h47.24
  text "34" at 4561.94,547.24 h47.24
  text "N" at 240.16,452.76 h47.24
  text "2.3000" at 833.19,452.76 h47.24
  text "Yes" at 2459.38,452.76 h47.24
  text "No" at 3002.9,452.76 h47.24
  text "Rnd 2,3" at 3649.36,452.76 h47.24
  text "6" at 4586.61,452.76 h47.24
  text "P" at 240.16,358.27 h47.24
  text "3.6000" at 833.19,358.27 h47.24
  text "Yes" at 2459.38,358.27 h47.24
  text "No" at 3002.9,358.27 h47.24
  text "Rnd 3,6" at 3649.36,358.27 h47.24
  text "21" at 4562.37,358.27 h47.24
  text "R" at 240.16,263.78 h47.24
  text "0.5000" at 833.19,263.78 h47.24
  text "No" at 2483.22,263.78 h47.24
  text "No" at 3002.9,263.78 h47.24
  text "Rnd 0,5 Non-Plated" at 3399.78,263.78 h47.24
  text "16" at 4562.37,263.78 h47.24
  text "T" at 240.16,169.29 h47.24
  text "1.0000" at 833.92,169.29 h47.24
  text "No" at 2483.22,169.29 h47.24
  text "No" at 3002.9,169.29 h47.24
  text "Rnd 1 Non-Plated" at 3443.34,169.29 h47.24
  text "163" at 4538.66,169.29 h47.24
  text "U" at 240.16,74.8 h47.24
  text "1.3000" at 833.92,74.8 h47.24
  text "No" at 2483.22,74.8 h47.24
  text "No" at 3002.9,74.8 h47.24
  text "Rnd 1,3 Non-Plated" at 3400.6,74.8 h47.24
  text "6" at 4586.61,74.8 h47.24